# Altium PCB ffultra_pcb_attempt2.PcbDoc (part 1 of 3)
Units mil, origin at the board's own origin, x right, y up, seen from the top; angles counter-clockwise.
Board outline 1102.36 x 2165.35 mil, 6 copper layers (Top, GND-T, Inner, Power, GND-B, Bottom), stack 60.567 mil thick; 114 components, 86 nets, 459 pads, 324 vias.
Unrouted connection lines stored in the file: 9.
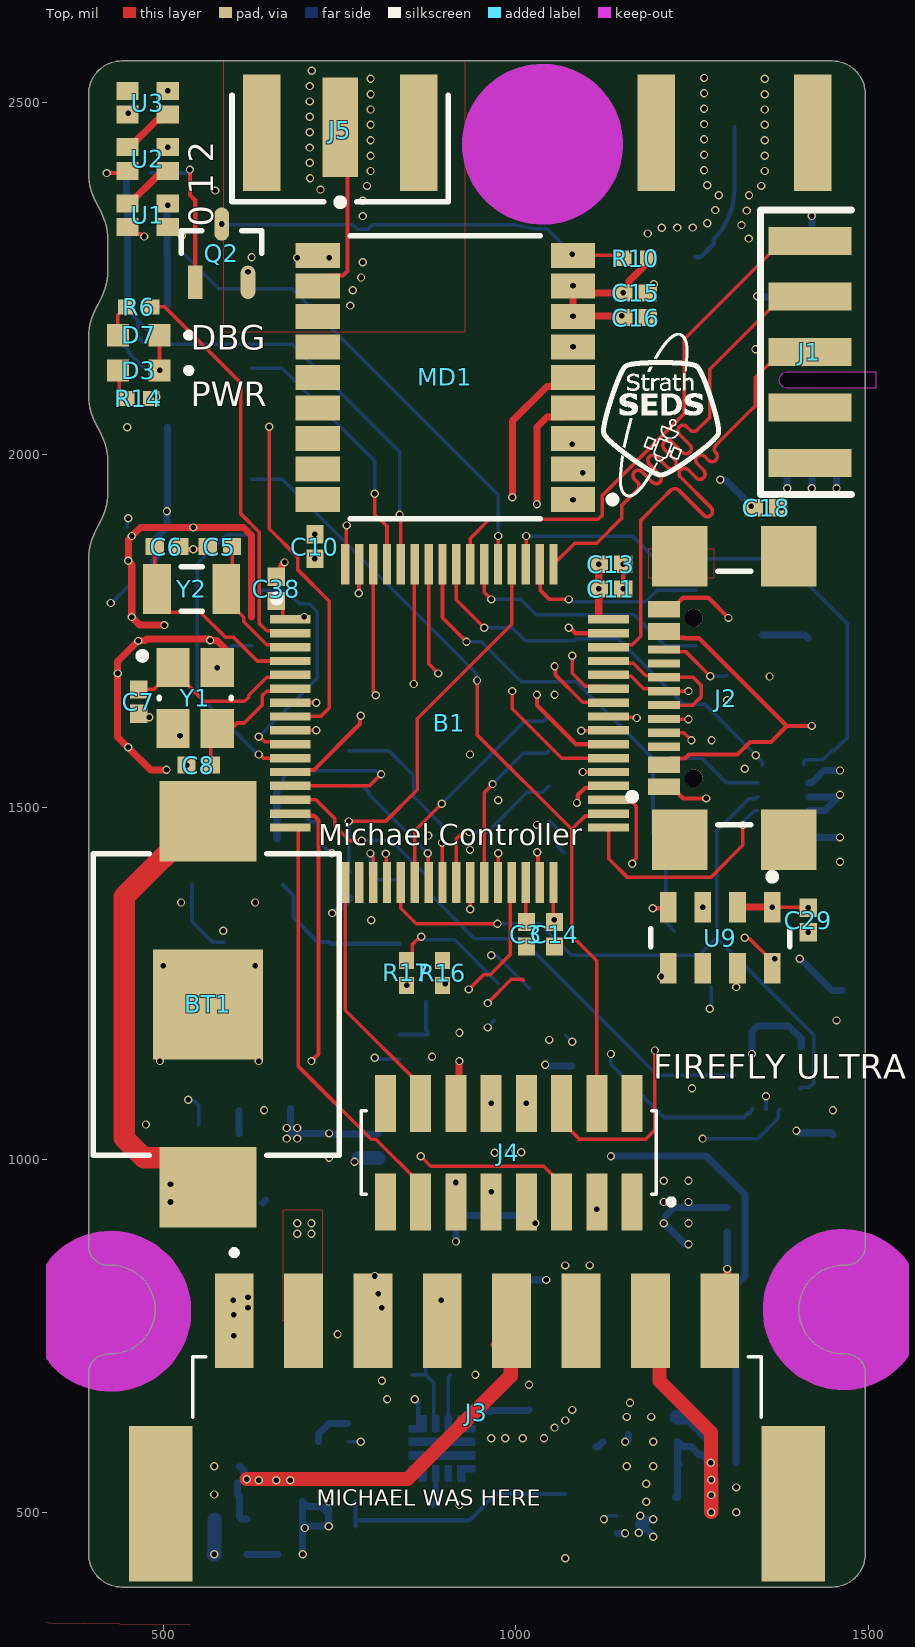
[diagram p0: Top view]
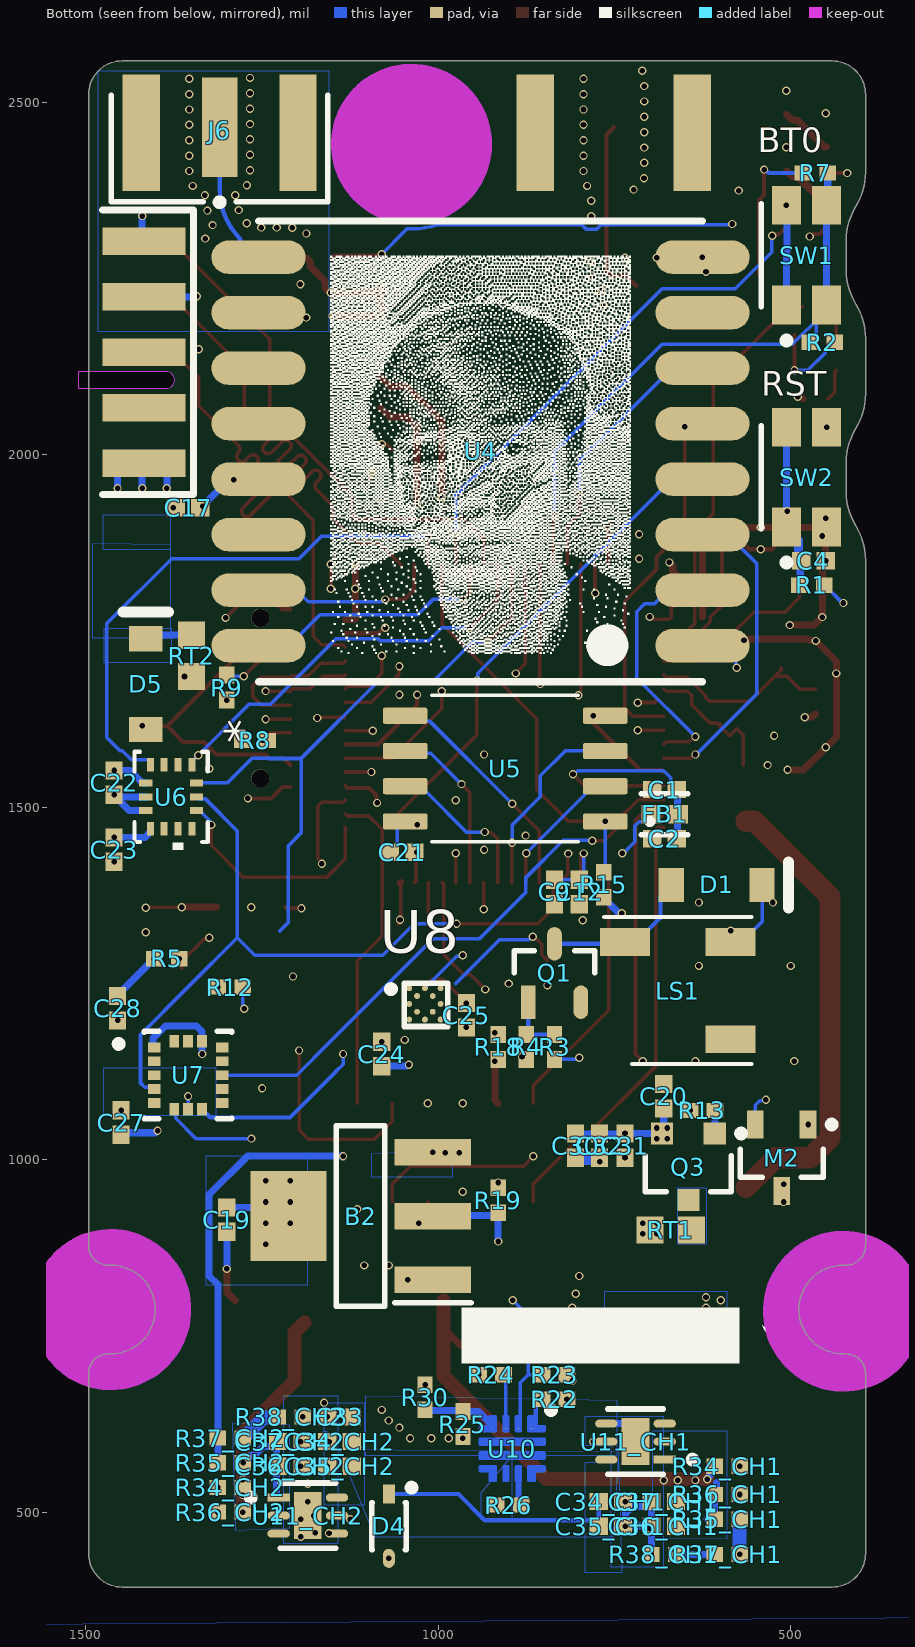
[diagram p1: Bottom view, seen from below]
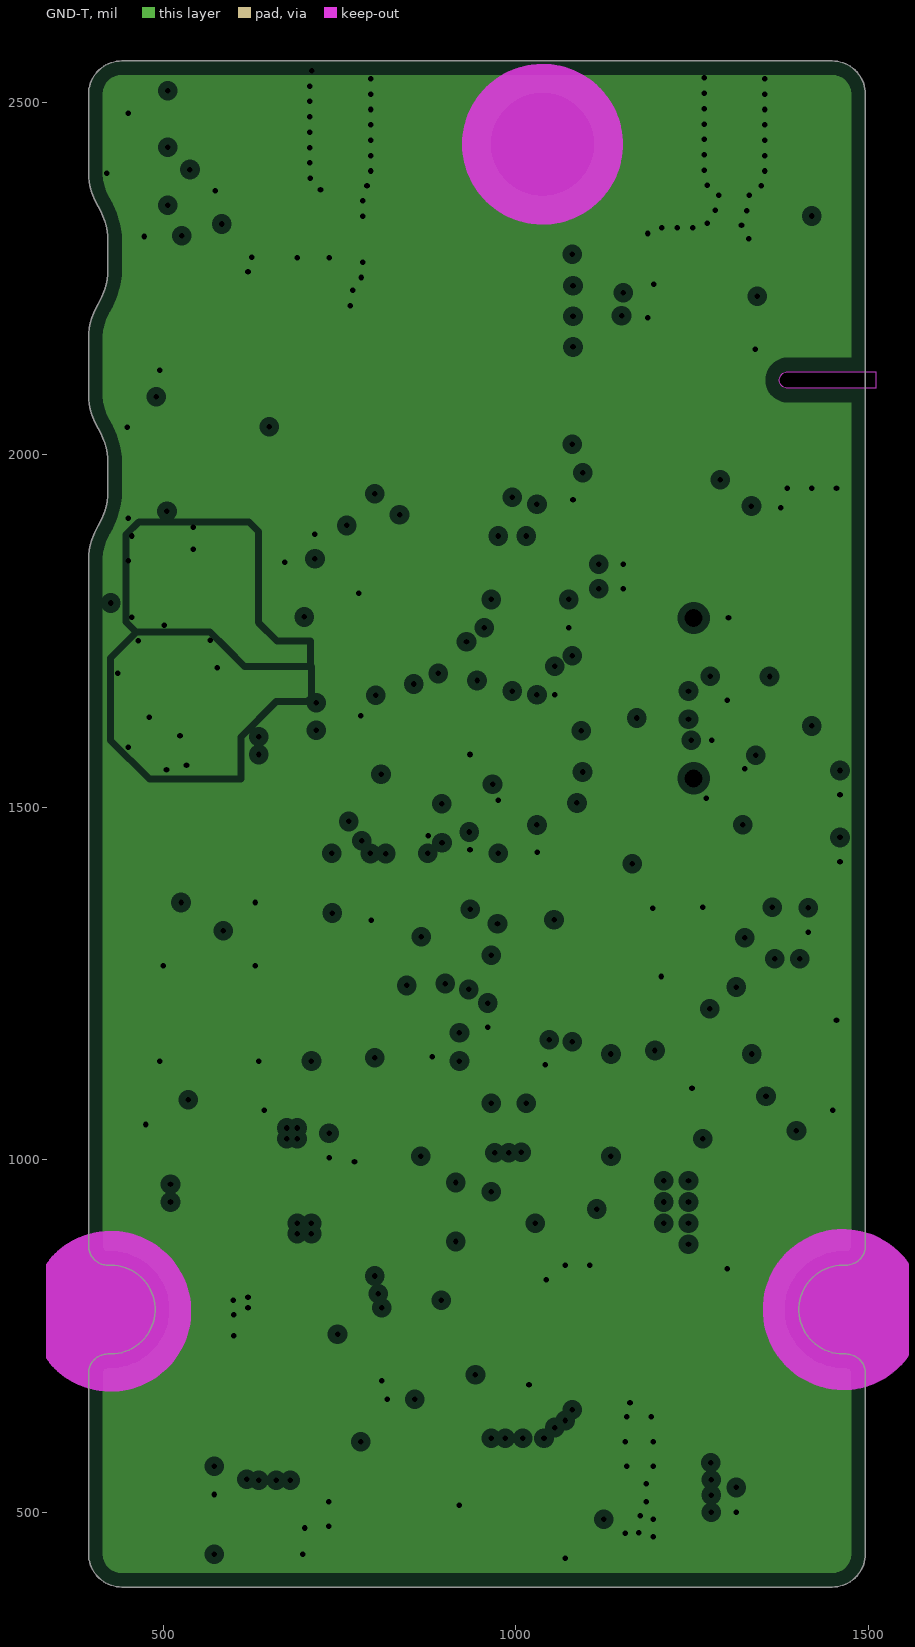
[diagram p2: GND-T, clearances drawn from the general rule]
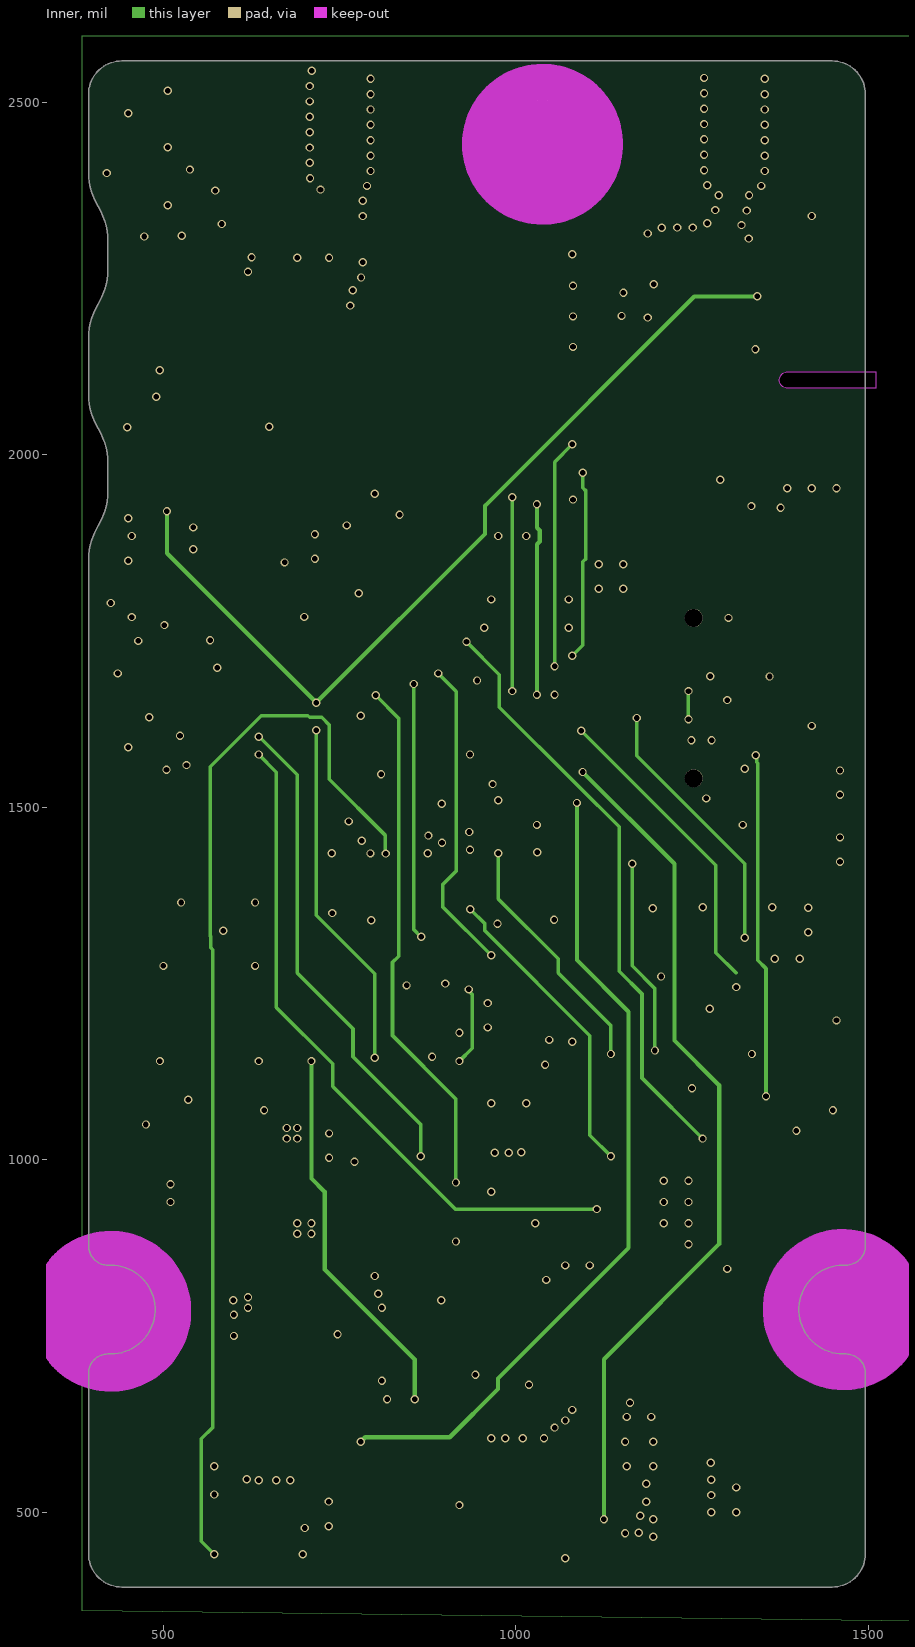
[diagram p3: Inner]
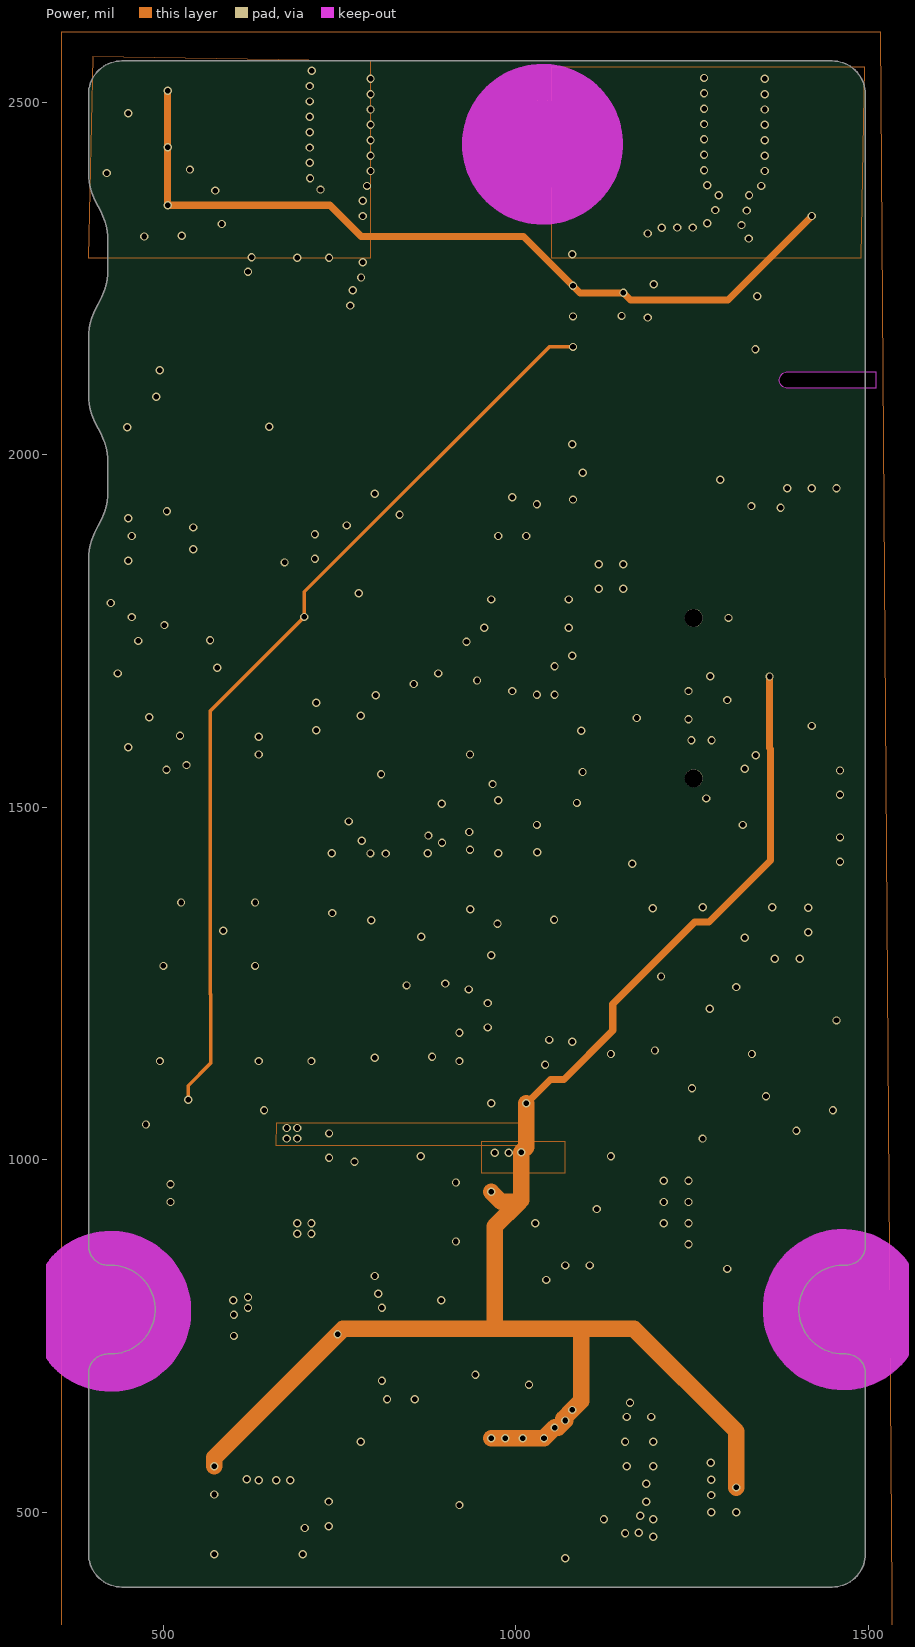
[diagram p4: Power]
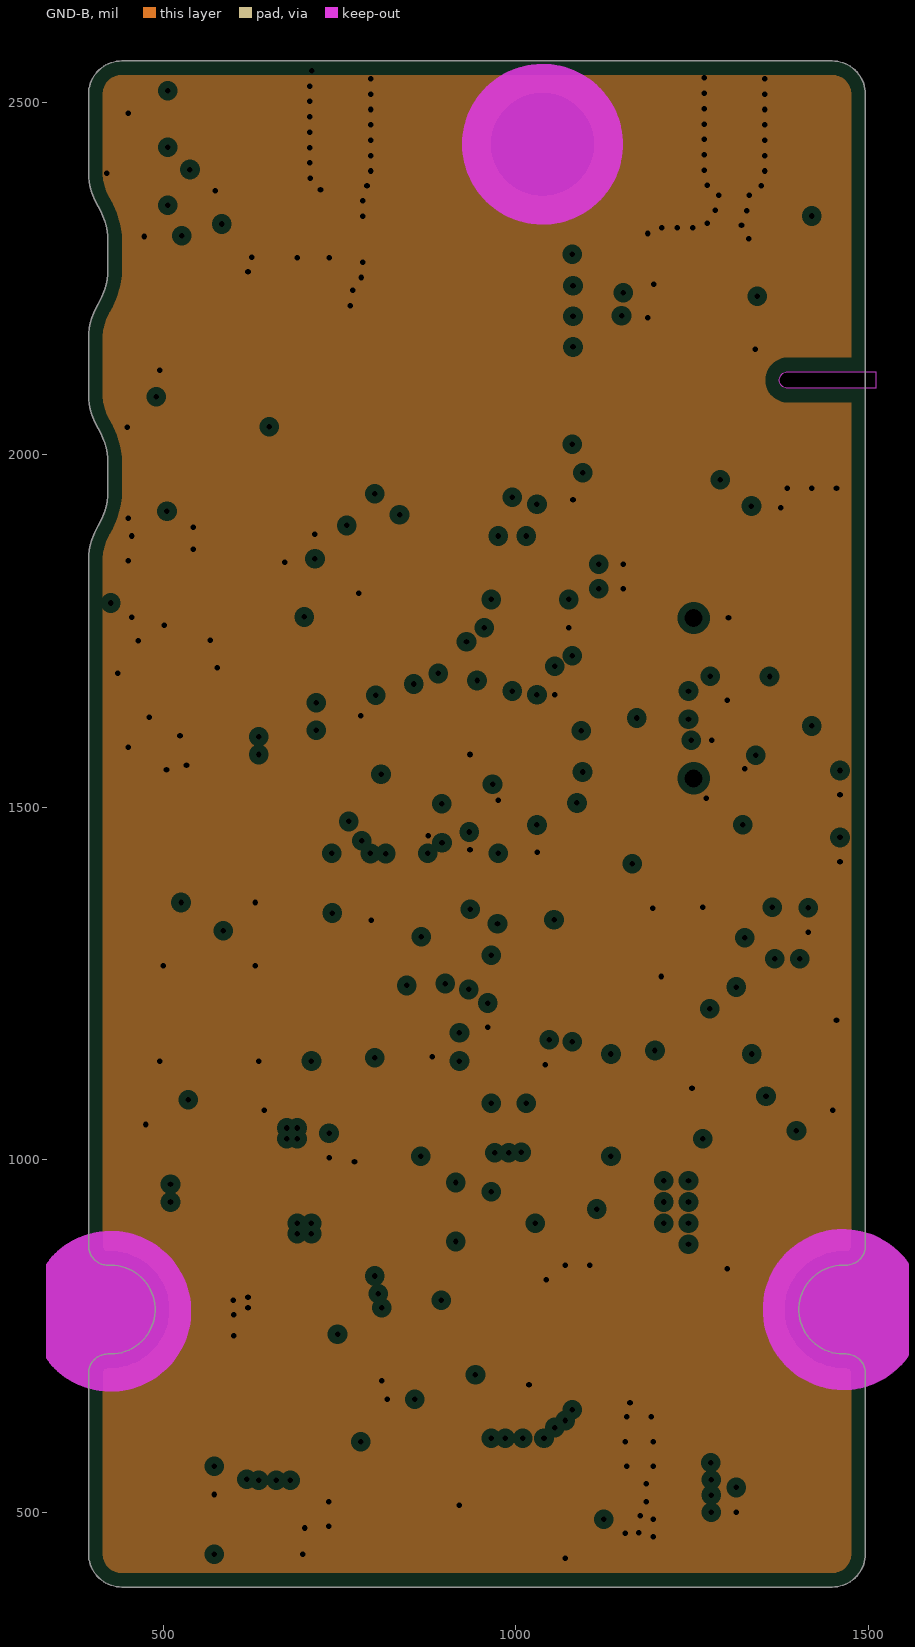
[diagram p5: GND-B, clearances drawn from the general rule]

## Layer stack, top to bottom
Top Solder: solder mask 1.2, SM-001, Dk 3.8
Top: signal copper 1.378
Dielectric 4: prepreg 3.9134, 3313, Dk 4.05
GND-T: plane copper 0.5984, net GND
Dielectric 2: core 21.6535, Core-009, Dk 4.6
Inner: signal copper 0.5984
Dielectric 1: prepreg 4.2835, 2116, Dk 4.25
Power: signal copper 0.5984
Dielectric 3: core 21.6535, Core-009, Dk 4.6
GND-B: plane copper 0.5984, net GND
Dielectric 5: prepreg 3.9134, 3313, Dk 4.05
Bottom: signal copper 1.378
Bottom Solder: solder mask 1.2, SM-001, Dk 3.8

## Board outline
393.7,696.85 cw(c421.26,696.85) 421.26,724.41 425.2,724.41 ccw(c425.2,787.4) 425.2,850.39 421.26,850.39 cw(c421.26,877.95) 393.7,877.95 393.7,1850.39 cw(c488.47,1850.39) 407.48,1899.61 ccw(c326.49,1948.82) 421.26,1948.82 421.26,1988.19 ccw(c326.49,1988.19) 407.48,2037.4 cw(c488.47,2086.61) 393.7,2086.61 393.7,2165.35 cw(c488.47,2165.35) 407.48,2214.57 ccw(c326.49,2263.78) 421.26,2263.78 421.26,2303.15 ccw(c326.49,2303.15) 407.48,2352.36 cw(c488.47,2401.57) 393.7,2401.57 393.7,2511.81 cw(c440.94,2511.81) 440.94,2559.06 1448.82,2559.06 cw(c1448.82,2511.81) 1496.06,2511.81 1496.06,877.95 cw(c1468.5,877.95) 1468.5,850.39 1464.57,850.39 ccw(c1464.57,787.4) 1464.57,724.41 1468.5,724.41 cw(c1468.5,696.85) 1496.06,696.85 1496.06,440.94 cw(c1448.82,440.94) 1448.82,393.7 440.94,393.7 cw(c440.94,440.94) 393.7,440.94

## Design rules (kind name [scope] priority, off if disabled: settings)
BoardOutlineClearance [All] p1: gap=7.87 ignorepadtopadclearanceinfootprint=FALSE except(0: Text-OutlineEdge Text-CavityEdge Text-CutoutEdge Text-SplitBarrior Text-SplitContinuation)
Clearance [All] p1: gap=10 ignorepadtopadclearanceinfootprint=TRUE except(0: Arc-Hole Track-Hole SMDPad-Hole THPad-Hole Via-Hole Fill-Hole Poly-Hole Region-Hole Text-Hole; 3.54: Arc-Arc Arc-Track Track-Track; 5: SMDPad-SMDPad; 7.87: Arc-SMDPad Track-SMDPad SMDPad-Fill SMDPad-Poly SMDPad-Region Fill-Fill Fill-Poly Fill-Region Poly-Poly Poly-Region Region-Region; 12.99: Arc-THPad Track-THPad; 19.68: THPad-THPad)
DiffPairsRouting [All] p1: maxlimit=10 minlimit=3.54 mostfreqgap=10 toplayer_minwidth=3.54 toplayer_maxwidth=15 toplayer_prefwidth=10 midlayer2_minwidth=3.54 midlayer2_maxwidth=15 midlayer2_prefwidth=10 midlayer3_minwidth=3.54 midlayer3_maxwidth=15 midlayer3_prefwidth=10 bottomlayer_minwidth=3.54 bottomlayer_maxwidth=15 bottomlayer_prefwidth=10 maxuncoupledlength=500
HoleSize [All] p1: absolutevalues=TRUE maxlimit=248.03 minlimit=7.87 maxpercent=80.000 minpercent=20.000
MatchedLengths [(InNet('SWO') OR InNet('SWCLK') OR InNet('SWDIO') OR InNet('SWDIO'))] p1: tolerance=1 checknetsindiffpair=FALSE checkdiffpairvsdiffpair=TRUE checkxsignals=TRUE checkothers=TRUE
MatchedLengths "Schematic Matched Net Lengths" [InNetClass('STLINK')] p2: tolerance=3.94 checknetsindiffpair=FALSE checkdiffpairvsdiffpair=TRUE checkxsignals=TRUE checkothers=TRUE
MinimumSolderMaskSliver [All] p1: minsoldermaskwidth=3.54
PlaneClearance [All] p1: clearance=10
PlaneConnect [All] p1: pad.planeconnectstyle=Relief pad.reliefexpansion=10 pad.reliefentries=4 pad.reliefconductorwidth=10 pad.reliefairgap=10 via.planeconnectstyle=Direct via.reliefexpansion=20 via.reliefentries=4 via.reliefconductorwidth=10 via.reliefairgap=10
PolygonConnect PolygonConnect_gnd_ant [IsNamedPolygon('GND_ANT')] p1: thpad.connectstyle=Relief thpad.reliefconductorwidth=10 thpad.reliefentries=4 thpad.polygonreliefangle="90 Angle" thpad.airgapwidth=10 smdpad.connectstyle=Relief smdpad.reliefconductorwidth=19.68 smdpad.reliefentries=4 smdpad.polygonreliefangle="90 Angle" smdpad.airgapwidth=5 via.connectstyle=Direct via.reliefconductorwidth=10 via.reliefentries=4 via.polygonreliefangle="90 Angle" via.airgapwidth=10
PolygonConnect [All] p2: thpad.connectstyle=Relief thpad.reliefconductorwidth=10 thpad.reliefentries=4 thpad.polygonreliefangle="90 Angle" thpad.airgapwidth=10 smdpad.connectstyle=Direct smdpad.reliefconductorwidth=10 smdpad.reliefentries=4 smdpad.polygonreliefangle="90 Angle" smdpad.airgapwidth=10 via.connectstyle=Direct via.reliefconductorwidth=10 via.reliefentries=4 via.polygonreliefangle="90 Angle" via.airgapwidth=10
RoutingVias [All] p1: holewidth=7.87 width=13.78 viastyle="Through Hole" minholewidth=5.91 minwidth=9.84 maxholewidth=28 maxwidth=50 useviatemplates=TRUE viatemplateguid#1={D842139F-6F32-4212-9B27-BAE97ACFDABE} viatemplateguid#2={DD1D606A-29FF-4885-8C69-D1AE082B58F4} viatemplatename#1=v30h20 viatemplatename#2=v35h20
SolderMaskExpansion SolderMaskExpansion_via [IsVia] p1: expansion=4 istentingtop=TRUE
SolderMaskExpansion [All] p2: expansion=1.97 istentingtop=FALSE
SupplyNets "Schematic Supply Nets_4" [InNet('VBACKUP')] p1: voltage=0.000
SupplyNets "Schematic Supply Nets_2" [InNet('3V3')] p2: voltage=0.000
SupplyNets "Schematic Supply Nets_5" [InNet('VBAT')] p3: voltage=0.000
SupplyNets "Schematic Supply Nets_1" [InNet('GND')] p4: voltage=0.000
SupplyNets "Schematic Supply Nets" [InNet('VDDA')] p5: voltage=0.000
Width Width_ANT [InNet('GPS_ANT','RD_ANT')] p1: maxlimit=6.08 minlimit=5.18 preferedwidth=6.08 toplayer_minwidth=6.08 bottomlayer_minwidth=6.08 impedanceprofiledriven=TRUE impedanceprofileid={4A9DADD4-1E54-47D4-9708-552C67BF1AE2} impedanceprofilevalue=50.000000 minimp=50.000000 maximp=50.000000 favimp=50.000000
Width [All] p2: maxlimit=29.92 minlimit=3.94 preferedwidth=10 minimp=50.000000 maximp=50.000000 favimp=50.000000
25 further rules are at their usual default settings.

## Classes and differential pairs
component class "Human Interfaces": D1 D7 LS1 Q1 R3 R4 R6 U1 U2 U3
channel class ffultra_p2_channel: CH1 CH2
component class Pyro: R22 R23
component class Pressure: C29 U9
component class P1: C30 C31 C32 C33 D4 R24 R25 R26 R30 U10
component class IMU: C22 C23 C24 C25 C27 C28 U6 U7 U8
component class CH2: C34_CH2 C35_CH2 C36_CH2 C37_CH2 R34_CH2 R35_CH2 R36_CH2 R37_CH2 R38_CH2 U11_CH2
component class CH1: C34_CH1 C35_CH1 C36_CH1 C37_CH1 R34_CH1 R35_CH1 R36_CH1 R37_CH1 R38_CH1 U11_CH1
net class STLINK: SWCLK SWDIO SWO
net class QSPI: "Flash CLK" "Flash IO 0" "Flash IO 1" "Flash IO 2" "Flash IO 3" "Flash NCS"
component class Storage: C21 R15 U5
component class Power: B2 C19 C20 D3 D5 Q3 R13 R14 RT1 RT2
component class Wireless: BT1 C15 C16 C17 C18 C38 J5 J6 M2 MD1 Q2 R7 R10 U4
component class Connectors: 32 J2 J3 J4 R8 R9
component class MCU: B1 C1 C2 C3 C4 C5 C6 C7 C8 C9 C10 C11 C12 C13 C14 FB1 J1 R1 R2 R5 R12 R16 R17 R18 R19 SW1 SW2 Y1 Y2
differential pair USB_Data: +USB_Data_P -USB_Data_N

## Components (designator, comment, footprint, x,y, rotation, side; value= is the part's Value field where it differs from the comment)
B1 "STM32F412RGT6" QFP50P1200X1200X160-64N 905.79,1619.09 r0 top
B2 "LDL1117S33R" SOT230P700X180-4N 1110,920 r0 bottom
BT1 "3030" FP-3030-MFG 574.8,1220.47 r90 top
C1 "CL05B104KO5NNNC" CAP-0402 678.82,1525.31 r180 bottom value=100nF
C2 "CL05A105KA5NQNC" CAP-0402 678.82,1455.31 r180 bottom value=1µF
C3 "CL05A475MP5NRNC" CAP-0402 1015,1320 r90 top value=4.7µF
C4 "CL05B104KO5NNNC" CAP-0402 467.6,1850 r0 bottom value=100nF
C5 "C1005NP0439CGTS" CAP-0402 580,1870 r0 top value=4.3pF
C6 "C1005NP0439CGTS" CAP-0402 505,1870 r180 top value=4.3pF
C7 "0402CG6R0C500NT" CAP-0402 465,1650 r90 top value=6pF
C8 "0402CG6R0C500NT" CAP-0402 550,1560 r0 top value=6pF
C9 "CL05A475MP5NRNC" CAP-0402 835,1380 r90 bottom value=4.7µF
C10 "CL05B104KO5NNNC" CAP-0402 715,1870 r270 top value=100nF
C11 "CL05B104KO5NNNC" CAP-0402 1135,1810 r180 top value=100nF
C12 "CL05B104KO5NNNC" CAP-0402 800,1380 r90 bottom value=100nF
C13 "CL05B104KO5NNNC" CAP-0402 1135,1845 r180 top value=100nF
C14 "CL05B104KO5NNNC" CAP-0402 1055,1320 r90 top value=100nF
C15 "0402CG101J500NT" CAP-0402 1170,2230 r180 top value=100pF
C16 "CL05B104KO5NNNC" CAP-0402 1170,2195 r180 top value=100nF
C17 "GRM155R61A106ME44D" CAP-0402 1355,1925 r180 bottom value=10µF
C18 "CL05B104KO5NNNC" CAP-0402 1355,1925 r180 top value=100nF
C19 "CL05A475MP5NRNC" CAP-0402 1300,915 r90 bottom value=4.7µF
C20 "CL05A105KA5NQNC" CAP-0402 680,1090 r270 bottom value=1µF
C21 "CL05B104KO5NNNC" CAP-0402 1051.1,1436.22 r0 bottom value=100nF
C22 "CL05B104KO5NNNC" CAP-0402 1460,1535 r90 bottom value=100nF
C23 "CL05B104KO5NNNC" CAP-0402 1460,1440 r90 bottom value=100nF
C24 "CL05B104KO5NNNC" CAP-0402 1080,1150 r90 bottom value=100nF
C25 "CL05B104KO5NNNC" CAP-0402 960,1205 r270 bottom value=100nF
C27 "CL05A105KA5NQNC" CAP-0402 1450,1052.68 r270 bottom value=1µF
C28 "CL05B104KO5NNNC" CAP-0402 1455,1215 r90 bottom value=100nF
C29 "CL05B104KO5NNNC" CAP-0402 1415,1340 r270 top value=100nF
C30 "GRM155R61A106ME44D" CAP-0402 805,1020 r270 bottom value=10µF
C31 "GRM155R61A106ME44D" CAP-0402 735,1020 r270 bottom value=10µF
C32 "CL05A105KA5NQNC" CAP-0402 771.1,1020 r90 bottom value=1µF
C33 "CL05A225MQ5NSNC" CAP-0402 1140,635 r180 bottom value=2.2µF
C34_CH1 "CL05A225MQ5NSNC" CAP-0402 755,515 r0 bottom value=2.2µF (schematic designator C34)
C34_CH2 "CL05A225MQ5NSNC" CAP-0402 1140,600 r180 bottom value=2.2µF (schematic designator C34)
C35_CH1 "CL05A225MQ5NSNC" CAP-0402 755,480 r0 bottom value=2.2µF (schematic designator C35)
C35_CH2 "CL05A225MQ5NSNC" CAP-0402 1140,565 r180 bottom value=2.2µF (schematic designator C35)
C36_CH1 "CL05A105KA5NQNC" CAP-0402 680,480 r180 bottom value=2.2µF (schematic designator C36)
C36_CH2 "CL05A105KA5NQNC" CAP-0402 1210,565 r0 bottom value=2.2µF (schematic designator C36)
C37_CH1 "CL05A105KA5NQNC" CAP-0402 680,515 r180 bottom value=2.2µF (schematic designator C37)
C37_CH2 "CL05A105KA5NQNC" CAP-0402 1210,600 r0 bottom value=2.2µF (schematic designator C37)
C38 "CL05A105KA5NQNC" CAP-0402 660,1810 r90 top value=1µF
D1 "SM4007PL-TP" MCC-SOD-123FL_V 605,1390 r180 bottom
D3 "KT-0603R" LED_KT-0603R 465,2120 r180 top
D4 "1N5819WS" FP-477-02-IPC_C 1070,480 r270 bottom
D5 "SM4007PL" MCC-SOD-123FL_V 1415,1675 r90 bottom
D7 "KT-0603R" LED_KT-0603R 465,2170 r180 top
FB1 "BLM15AG601SN1D" FP-BLM15-0_05-IPC_A 678.82,1490.31 r0 bottom
J1 "009159010061911" 009159010061911-Footprint-1 1496.06,2145.67 r270 top
J2 "TYPE-C16PQTWT" FP-USB4110-GF-A-MFG 1355,1655 r90 top
J3 "1771088" PHOENIX_1771088 944.88,366.14 r0 top
J4 "20021321-00016C4LF" AMPHENOL_20021321-00016C4LF 990,1010.12 r0 top
J5 "SMA-J-P-H-ST-EM1" "Copy of FP-SMA-J-P-H-ST-EM1-MFG" 750.79,2727.2 r180 top locked
J6 "SMA-J-P-H-ST-EM1" SMA-J-P-H-ST-EM1-With-868-ant 1325.16,2685.81 r0 bottom locked
LS1 "MLT-5020" MLT-5020 660,1240 r0 bottom
M2 "XC6206P332MR-G" SOT95P245X110-3N 512.6,1002.76 r270 bottom
MD1 "TESEO-LIV4F" FP-LCC-18-MFG 900,2110 r180 top
Q1 "AO3400A" FP-SOT23-IPC_C 835,1265 r90 bottom
Q2 "AO3400A" FP-SOT23-IPC_C 582.6,2286.36 r90 top
Q3 "AO3401A" AO-SOT-23-3L_V 645,990 r270 bottom
R1 "0402WGF1002TCE" RES-0402 470,1815 r180 bottom value=10k
R2 "0402WGF1002TCE" RES-0402 455,2160 r0 bottom value=10k
R3 "0402WGF3300TCE" RES-0402 835,1160 r90 bottom value=330
R4 "0402WGF1002TCE" RES-0402 875,1160 r90 bottom value=10k
R5 "0402WGF2201TCE" RES-0402 1385,1285 r0 bottom value=2.2k
R6 "0402WGF3300TCE" RES-0402 465,2210 r0 top value=330
R7 "0402WGF1002TCE" RES-0402 465,2400 r180 bottom value=10k
R8 "0402WGF5101TCE" RES-0402 1260,1595 r180 bottom value=5.1k
R9 "0402WGF5101TCE" RES-0402 1300,1670 r90 bottom value=5.1k
R10 "0402WGF1001TCE" RES-0402 1170,2279.17 r180 top value=1k
R12 "0402WGF2201TCE" RES-0402 1295,1245 r180 bottom value=2.2k
R13 "0402WGF1002TCE" RES-0402 625,1070 r180 bottom value=10k
R14 "0402WGF2200TCE" RES-0402 465,2080 r0 top value=220
R15 "0402WGF1002TCE" RES-0402 765,1390 r270 bottom value=10k
R16 "0402WGF2201TCE" RES-0402 896.02,1265 r270 top value=2.2k
R17 "0402WGF2201TCE" RES-0402 845,1265 r270 top value=2.2k
R18 "0402WGF2201TCE" RES-0402 915,1160 r90 bottom value=2.2k
R19 "0402WGF2201TCE" RES-0402 915,942.72 r270 bottom value=2.2k
R22 "0402WGF1002TCE" RES-0402 835,660 r0 bottom value=10k
R23 "0402WGF1002TCE" RES-0402 835,695 r0 bottom value=10k
R24 "0402WGF1002TCE" RES-0402 925,695 r0 bottom value=10k
R25 "0402WGF4702TCE" RES-0402 965,625 r270 bottom value=47k
R26 "0402WGF6800TCE" RES-0402 900,510 r180 bottom value=680
R30 "0402WGF1002TCE" RES-0402 1018.7,663.02 r270 bottom value=10k
R34_CH1 "0402WGF4702TCE" RES-0402 590,565 r180 bottom value=47k (schematic designator R34)
R34_CH2 "0402WGF4702TCE" RES-0402 1295,535 r0 bottom value=47k (schematic designator R34)
R35_CH1 "0402WGF4702TCE" RES-0402 590,490 r0 bottom value=47k (schematic designator R35)
R35_CH2 "0402WGF4702TCE" RES-0402 1295,570 r180 bottom value=47k (schematic designator R35)
R36_CH1 "0402WGF4702TCE" RES-0402 590,525 r0 bottom value=47k (schematic designator R36)
R36_CH2 "0402WGF4702TCE" RES-0402 1295,500 r180 bottom value=47k (schematic designator R36)
R37_CH1 "0402WGF2202TCE" RES-0402 590,440 r180 bottom value=22k (schematic designator R37)
R37_CH2 "0402WGF2202TCE" RES-0402 1295,605 r0 bottom value=22k (schematic designator R37)
R38_CH1 "0402WGF1002TCE" RES-0402 680,440 r180 bottom value=10k (schematic designator R38)
R38_CH2 "0402WGF1002TCE" RES-0402 1210,635 r0 bottom value=10k (schematic designator R38)
RT1 "2A Fuse" THRMC1608X95N 670,900 r180 bottom
RT2 "2A Fuse" THRMC1608X95N 1350,1715 r270 bottom
SW1 "EVQ-P7A01P" FP-EVQ-P7A01P-MFG 464.57,2283.46 r90 bottom locked
SW2 "EVQ-P7A01P" FP-EVQ-P7A01P-MFG 464.57,1968.5 r90 bottom locked
U1 "XL-1615RGBC-WS2812B" XL-1615RGBC-WS2812B-Footprint-1 477.44,2340 r0 top
U2 "XL-1615RGBC-WS2812B" XL-1615RGBC-WS2812B-Footprint-1 477.44,2420 r0 top
U3 "XL-1615RGBC-WS2812B" XL-1615RGBC-WS2812B-Footprint-1 477.44,2500 r0 top
U4 "LoRa-CC68-868-TCXO" LoRa-CC68-868-TCXO-Footprint-1 940,2005 r0 bottom
U5 "W25Q128JVSIQ" SOIC127P790X216-8N 905,1555 r0 bottom
U6 "BMI323" BMI323_BOS 1379,1515 r270 bottom
U7 "H3LIS331DLTR" FP-TFLGA16-7983231-MFG 1355,1120 r180 bottom
U8 "BMM150" FP-BMM150-IPC_B 1017.48,1219.76 r180 bottom
U9 "MS560702BA03-50" TECO-MS560702BA03-50_V 1290,1315 r270 top
U10 "TPS22811LRPWR" TPS22811LRPWR-Footprint-1 895,590 r270 bottom
U11_CH1 "TPS22810DRVR" FP-DRV0006A-IPC_A 720,600 r0 bottom (schematic designator U11)
U11_CH2 "TPS22810DRVR" FP-DRV0006A-IPC_A 1185,495 r180 bottom (schematic designator U11)
Y1 "NX3225GA-16.000M-STD-CRG-2" FP-NX3225GA-MFG 545,1655 r270 top value=8pF
Y2 "NX3215SA-32.768KHZ-EXS00A-MU00746" FP-NX3215SA-MFG 540,1810 r180 top value=7pF

## Footprints (in the part's own frame and the unit in brackets; to place one, negate y for a bottom-side part, rotate by r counter-clockwise, add the part's x,y. Pads: shape width x height; smd on the part's side, far side on the other; paste and mask are expansions set on the pad)
009159010061911-Footprint-1 [mm]
  rect 1x3 smd: 1(3.991,-2) 2(1.991,-2) 3(-0.009,-2) 4(-2.009,-2) 5(-4.009,-2)
  rect 1x3 smd far side: 6(4,-2) 7(2,-2) 8(0,-2) 9(-2,-2) 10(-4,-2)
  Keep-Out Layer board cut-out: 0.7,0.381 1.3,0.381 1.3,-2.8 1.27,-2.93 1.187,-3.035 1.067,-3.092 0.933,-3.092 0.813,-3.035 0.73,-2.93 0.7,-2.8 0.7,-2.8
  silkscreen extent -5.13,-3.78 5.13,-0.5, body extent -5,-3.5 5,6.5, height 1.7
AMPHENOL_20021321-00016C4LF [mm]
  rect 0.76x2.05 smd: 1(4.445,-1.775) 2(4.445,1.775) 3(3.175,-1.775) 4(3.175,1.775) 5(1.905,-1.775) 6(1.905,1.775) 7(0.635,-1.775) 8(0.635,1.775) 9(-0.635,-1.775) 10(-0.635,1.775) 11(-1.905,-1.775) 12(-1.905,1.775) 13(-3.175,-1.775) 14(-3.175,1.775) 15(-4.445,-1.775) 16(-4.445,1.775)
  silkscreen extent -5.31,-1.87 5.95,1.5, body extent -5.31,-2.25 5.31,2.25, height 4.65
AO-SOT-23-3L_V [mm] "SOT23, 3-Leads, Body 3.1x1.8mm, Pitch 0.95mm"
  rect 0.8x0.8 smd: 1(-1.2,0.95) 2(-1.2,-0.95) 3(1.2,0)
  silkscreen extent -1.32,-1.55 0.9,2.02, body extent -1.5,-1.55 1.5,1.55, height 1.25
BMI323_BOS [mil]
  rect 19x10 smd paste+0 mask+0: 1(-45.5,29.53) 2(-45.5,9.84) 3(-45.5,-9.84) 4(-45.5,-29.53) 8(45.5,-29.53) 9(45.5,-9.84) 10(45.5,9.84) 11(45.5,29.53)
  rect 10x19 smd paste+0 mask+0: 5(-19.68,-36) 6(0,-36) 7(19.68,-36) 12(19.68,36) 13(0,36) 14(-19.68,36)
  silkscreen extent -64,-52 75,52, body extent -59,-47 59,47, height 34
CAP-0402 [mm] "Chip Capacitor, 2-Leads, Body 1.00x0.50mm, IPC Medium Density"
  rect 0.66x0.62 smd: 1(-0.44,0) 2(0.44,0)
  body extent -0.53,-0.28 0.53,0.28, height 0.55
"Copy of FP-SMA-J-P-H-ST-EM1-MFG" [mm]
  rect 1.27x3.6 smd paste+0 mask+0: 1(0,6.66)
  rect 1.35x4.2 smd paste+0 mask+0: 2(-2.825,6.86) 3(2.825,6.86)
  rect 1.35x4.2 smd far side paste+0 mask+0: 4(-2.825,6.86) 5(2.825,6.86)
  silkscreen extent -3.9,5.5 3.9,9.48, body extent -9.25,-50 9.25,8.56, height 9.85
FP-477-02-IPC_C [mm]
  rect 0.686x0.436 smd paste+0 mask+0: 1(-1.16,0)
  rrect100% 0.686x0.436 smd paste+0 mask+0: 2(1.16,0)
  silkscreen extent -1.51,-0.63 0.85,0.94, body extent -1.25,-0.63 1.25,0.63, height 1.1
FP-3030-MFG [mm]
  rect 3.96x3.96 smd paste-1000 mask+0: 1(0,0.292)
  rect 2.9x3.5 smd paste+0 mask+0: 2(-6.6,0.292) 2(6.6,0.292)
  silkscreen extent -5.44,-4.43 5.44,4.43, body extent -8.15,-5.21 8.15,4.79, height 2.5
FP-BLM15-0_05-IPC_A [mil]
  rect 28.16x26.48 smd paste+0 mask+0: 1(-18.84,0) 2(18.84,0)
  silkscreen extent -33,-29 33,29, body extent -20,-10 20,10, height 22
FP-BMM150-IPC_B [mm]
  round 0.212 smd paste+0 mask+0: A1(-0.601,0.601) A3(-0.035,0.601) A5(0.531,0.601) B2(-0.318,0.318) B4(0.248,0.318) C1(-0.601,0.035) C5(0.531,0.035) D2(-0.318,-0.248) D4(0.248,-0.248) E1(-0.601,-0.531) E3(-0.035,-0.531) E5(0.531,-0.531)
  silkscreen extent -1.39,-0.78 0.78,0.78, body extent -0.78,-0.78 0.78,0.78, height 0.6
FP-DRV0006A-IPC_A [mm]
  rect 0.806x0.292 smd paste+0 mask+0: 1(-1.053,0.65)
  rrect100% 0.806x0.292 smd paste+0 mask+0: 2(-1.053,0) 3(-1.053,-0.65) 4(1.053,-0.65) 5(1.053,0) 6(1.053,0.65)
  rect 1x1.7 smd paste-1000 mask+0: 7(0,0)
  silkscreen extent -2.18,-1.17 1,1.17, body extent -1,-1 1,1, height 0.8
FP-EVQ-P7A01P-MFG [mm]
  rect 1.4x1.05 smd paste+0 mask+0: 1(-1.8,1.05) 1'(1.8,1.05) 2(-1.8,-0.4) 2'(1.8,-0.4)
  silkscreen extent -3.2,0.93 1.85,1.95, body extent -2.35,-1.75 2.35,1.8, height 1.36
FP-LCC-18-MFG [mm]
  rect 1.6x0.9 smd paste+0 mask+0: 1(-4.6,4.4) 2(-4.6,3.3) 3(-4.6,2.2) 4(-4.6,1.1) 5(-4.6,0) 6(-4.6,-1.1) 7(-4.6,-2.2) 8(-4.6,-3.3) 9(-4.6,-4.4) 10(4.6,-4.4) 11(4.6,-3.3) 12(4.6,-2.2) 13(4.6,-1.1) 14(4.6,0) 15(4.6,1.1) 16(4.6,2.2) 17(4.6,3.3) 18(4.6,4.4)
  silkscreen extent -6.15,-5.1 3.42,5.1, body extent -4.85,-5.05 4.85,5.05, height 2.33
FP-NX3215SA-MFG [mm]
  rect 1x1.8 smd paste+0 mask+0: 1(-1.25,0) 2(1.25,0)
  silkscreen extent -0.38,-0.8 0.38,0.8, body extent -1.85,-1 1.85,1, height 0.25
FP-NX3225GA-MFG [mm]
  rect 1.4x1.2 smd paste+0 mask+0: 1(-1.1,-0.8) 2(1.1,-0.8) 3(1.1,0.8) 4(-1.1,0.8)
  silkscreen extent -1.65,-2.03 0.03,1.3, body extent -1.9,-1.5 1.9,1.5, height 0.25
FP-SOT23-IPC_C [mm]
  rect 1.205x0.532 smd paste+0 mask+0: 1(-1.05,0.95)
  rrect100% 1.205x0.532 smd paste+0 mask+0: 2(-1.05,-0.95) 3(1.05,0)
  silkscreen extent 0,-1.45 0.8,1.45, body extent -1.41,-1.45 1.41,1.45, height 1.25
FP-TFLGA16-7983231-MFG [mm]
  rect 0.45x0.35 smd paste+0 mask+0: 1(-1.225,1) 2(-1.225,0.5) 3(-1.225,0) 4(-1.225,-0.5) 5(-1.225,-1) 9(1.225,-1) 10(1.225,-0.5) 11(1.225,0) 12(1.225,0.5) 13(1.225,1)
  rect 0.35x0.45 smd paste+0 mask+0: 6(-0.5,-1.225) 7(0,-1.225) 8(0.5,-1.225) 14(0.5,1.225) 15(0,1.225) 16(-0.5,1.225)
  silkscreen extent -2.63,-1.58 1.58,1.58, body extent -1.5,-1.5 1.5,1.5, height 1
FP-USB4110-GF-A-MFG [mm]
  rect 2.18x2 smd paste+0 mask+0: 1(-5.11,3.105) 2(5.11,3.105) 3(-5.11,-0.825) 4(5.11,-0.825)
  rect 0.6x1.15 smd paste+0 mask+0: A1-B12(-3.2,3.68) A4-B9(-2.4,3.68) B1-A12(3.2,3.68) B4-A9(2.4,3.68)
  rect 0.3x1.15 smd paste+0 mask+0: A5(-1.25,3.68) A6(-0.25,3.68) A7(0.25,3.68) A8(1.25,3.68) B5(1.75,3.68) B6(0.75,3.68) B7(-0.75,3.68) B8(-1.75,3.68)
  round 0.65 hole 0.65 unplated paste-2539.97 mask+0: M1(2.89,2.605) M2(-2.89,2.605)
  silkscreen extent -4.57,0.55 4.57,4.95, body extent -5.65,-3.67 5.65,4.03, height 3.26
LED_KT-0603R [mm]
  rect 0.8x0.8 smd: A(0.75,0) C(-0.75,0)
  silkscreen extent -1.9,-0.1 -1.7,0.1, body extent -0.8,-0.4 0.8,0.4, height 0.65
LoRa-CC68-868-TCXO-Footprint-1 [mm]
  oval 3.4x1.2 smd: 1(-8,7) 2(-8,5) 3(-8,3) 4(-8,1) 5(-8,-1) 6(-8,-3) 7(-8,-5) 8(-8,-7) 9(8,-7) 10(8,-5) 11(8,-3) 12(8,-1) 13(8,1) 14(8,3) 15(8,5) 16(8,7)
  silkscreen extent -8,-8.3 8,8.3, body extent -8,-8 8,8, height 2.1
MCC-SOD-123FL_V [mil] "SODFL, 2-Leads, Body 3.1x1.9mm"
  rect 36x48 smd: 1(-64.5,0) 2(64.5,0)
  silkscreen extent 102,-32 102,32, body extent -73,-37 73,37, height 47
MLT-5020 [mm]
  rect 1.8x1 smd: 1(-1.9,-1.75) 2(1.9,-1.75) 3(-1.9,1.75)
  silkscreen extent -2.65,-2.65 2.65,2.65, body extent -2.5,-2.5 2.5,2.5, height 2
PHOENIX_1771088 [mm]
  rect 1.4x3.4 smd: 1(-8.75,10.3) 2(-6.25,10.3) 3(-3.75,10.3) 4(-1.25,10.3) 5(1.25,10.3) 6(3.75,10.3) 7(6.25,10.3) 8(8.75,10.3)
  rect 2.3x5.6 smd: SH1(-11.4,3.7) SH2(11.4,3.7)
  silkscreen extent -10.25,6.82 10.25,12.85, body extent -12.2,0 12.2,11, height 5.11
QFP50P1200X1200X160-64N [mm]
  rect 1.475x0.3 smd: 1(-5.738,3.75) 2(-5.738,3.25) 3(-5.738,2.75) 4(-5.738,2.25) 5(-5.738,1.75) 6(-5.738,1.25) 7(-5.738,0.75) 8(-5.738,0.25) 9(-5.738,-0.25) 10(-5.738,-0.75) 11(-5.738,-1.25) 12(-5.738,-1.75) 13(-5.738,-2.25) 14(-5.738,-2.75) 15(-5.738,-3.25) 16(-5.738,-3.75) 33(5.738,-3.75) 34(5.738,-3.25) 35(5.738,-2.75) 36(5.738,-2.25) 37(5.738,-1.75) 38(5.738,-1.25) 39(5.738,-0.75) 40(5.738,-0.25) 41(5.738,0.25) 42(5.738,0.75) 43(5.738,1.25) 44(5.738,1.75) 45(5.738,2.25) 46(5.738,2.75) 47(5.738,3.25) 48(5.738,3.75)
  rect 0.3x1.475 smd: 17(-3.75,-5.738) 18(-3.25,-5.738) 19(-2.75,-5.738) 20(-2.25,-5.738) 21(-1.75,-5.738) 22(-1.25,-5.738) 23(-0.75,-5.738) 24(-0.25,-5.738) 25(0.25,-5.738) 26(0.75,-5.738) 27(1.25,-5.738) 28(1.75,-5.738) 29(2.25,-5.738) 30(2.75,-5.738) 31(3.25,-5.738) 32(3.75,-5.738) 49(3.75,5.738) 50(3.25,5.738) 51(2.75,5.738) 52(2.25,5.738) 53(1.75,5.738) 54(1.25,5.738) 55(0.75,5.738) 56(0.25,5.738) 57(-0.25,5.738) 58(-0.75,5.738) 59(-1.25,5.738) 60(-1.75,5.738) 61(-2.25,5.738) 62(-2.75,5.738) 63(-3.25,5.738) 64(-3.75,5.738)
  silkscreen extent -6.35,4.38 -6.1,4.62, body extent -6,-6 6,6, height 1.6
RES-0402 [mm] "Chip Resistor, 2-Leads, Body 1.00x0.50mm, IPC Medium Density"
  rect 0.6x0.55 smd: 1(-0.45,0) 2(0.45,0)
  body extent -0.55,-0.28 0.55,0.28, height 0.4
SMA-J-P-H-ST-EM1-With-868-ant [mm]
  rect 1.27x3.6 smd paste+0 mask+0: 1(-0.381,5.609)
  rect 1.35x4.2 smd paste+0 mask+0: 2(-3.206,5.809) 3(2.444,5.809)
  rect 1.35x4.2 smd far side paste+0 mask+0: 4(-3.206,5.809) 5(2.444,5.809)
  silkscreen extent -4.28,4.45 3.52,8.43, body extent -4.38,-47.25 3.62,7.02, height 4.55
SOIC127P790X216-8N [mm]
  rrect25% 1.61x0.58 smd: 1(-3.605,1.905) 2(-3.605,0.635) 3(-3.605,-0.635) 4(-3.605,-1.905) 5(3.605,-1.905) 6(3.605,-0.635) 7(3.605,0.635) 8(3.605,1.905)
  silkscreen extent -5.31,-2.64 2.64,2.64, body extent -3.95,-2.64 3.95,2.64, height 2.16
SOT95P245X110-3N [mm] "SOT23, 3-Leads, Body 2.90x2.45mm, Pitch 0.95mm, IPC Medium Density"
  rect 1x0.6 smd: 1(-1.2,0.95) 2(-1.2,-0.95) 3(1.2,0)
  silkscreen extent -1.32,-1.5 0.7,1.92, body extent -1.4,-1.45 1.4,1.45, height 1.3
SOT230P700X180-4N [mm]
  rect 2.75x0.95 smd: 1(-2.6,2.3) 2(-2.6,0) 3(-2.6,-2.3)
  rect 2.75x3.25 smd: 4(2.6,0)
  silkscreen extent -3.98,-3.25 0.87,3.25, body extent -3.5,-3.25 3.5,3.25, height 1.8
TECO-MS560702BA03-50_V [mm] "SMD, 8-Leads, Body 3x5mm, Pitch 1.25mm"
  rect 1.1x0.6 smd: 1(-1.1,1.875) 2(-1.1,0.625) 3(-1.1,-0.625) 4(-1.1,-1.875) 5(1.1,-1.875) 6(1.1,-0.625) 7(1.1,0.625) 8(1.1,1.875)
  silkscreen extent -2.32,-2.5 0.32,2.5, body extent -1.5,-2.5 1.5,2.5, height 0.96
THRMC1608X95N [mm]
  rect 0.98x0.97 smd: 1(-0.745,0) 2(0.745,0)
  body extent -0.8,-0.4 0.8,0.4, height 0.45
TPS22811LRPWR-Footprint-1 [mil]
  round 1 smd: 1(-28.54,27.56) 2(-28.54,8.86) 3(-28.54,-8.86) 4(-28.54,-27.56) 5(-9.84,0) 6(9.84,0) 7(28.54,-27.56) 8(28.54,-8.86) 9(28.54,8.86) 10(28.54,27.56)
  silkscreen extent -60,50 -50,60, body extent -39,-39 39,39, height 39
XL-1615RGBC-WS2812B-Footprint-1 [mm]
  rect 0.8x0.65 smd: 1(-0.725,0.425) 2(0.725,0.425) 3(-0.725,-0.425) 4(0.725,-0.425)
  body extent -0.8,-0.75 0.8,0.75, height 0.65

## Part data
B1: library part CMP-020-00025-2, "ARM Microcontrollers - MCU 16/32-BITS MICROS", JLCPCB Part Number=C94351, Manufacturer=STMicroelectronics, Mouser Part Number=511-STM32F412RGT6, Arrow Part Number=STM32F412RGT6, Arrow Price/Stock=https://www.arrow.com/en/products/stm32f412rgt6/stmicroelectronics?region=nac, Datasheet Link=http://www.st.com/content/ccc/resource/technical/document/datasheet/15/90/07/b3/8c/10/4e/95/DM00213872.pdf/files/DM00213872.pdf/jcr:content/translations/en.DM00213872.pdf, Design Item ID=STM32F412RGT6, Geometry.Height=1.6mm, Manufacturer_Part_Number=STM32F412RGT6, Mouser Price/Stock=https://www.mouser.co.uk/ProductDetail/STMicroelectronics/STM32F412RGT6?qs=qzCNEk%252BRr%252Bb0WoPVhlRQfQ%3D%3D, Source=STM32F412RGT6.SchLib
B2: library part CMP-172-000000-3, "STMICROELECTRONICS - LDL1117S33R - LDO, FIXED, 3.3V, 1.2A, SOT-223-3", JLCPCB Part Number=C435835, Manufacturer_Name=STMicroelectronics, Mouser Part Number=511-LDL1117S33R, Datasheet Link=https://componentsearchengine.com/Datasheets/2/LDL1117S33R.pdf, Design Item ID=LDL1117S33R, Geometry.Height=1.8mm, Manufacturer_Part_Number=LDL1117S33R, Mouser Price/Stock=https://www.mouser.co.uk/ProductDetail/STMicroelectronics/LDL1117S33R?qs=AQlKX63v8Rt9Bf6AWSrbFg%3D%3D, Source=LDL1117S33R.SchLib
BT1: library part CMP-002-00103-4, "Batteries/Accessories", RoHS Compliant=Yes
C1 C4 C10 C11 C12 C13 C14 C16 C18 C21 C22 C23 C24 C25 C28 C29: library part CMP-001-00142-1, "Capacitor, Ceramic (MLCC), 100nF, ±10%, 16V, X7R, ±10%, SMD 0402", Case/Package=0402, JLCPCB Basic Part=Yes, JLCPCB Part Number=C1525, Manufacturer="Samsung Electro-Mechanics", Temperature Coefficient=X7R, Tolerance=10%, Voltage Rating=16V, Category="Capacitors - MLCC", ComponentLink1Description=Datasheet, ComponentLink1URL=https://datasheet.lcsc.com/lcsc/1810191219_Samsung-Electro-Mechanics-CL05B104KO5NNNC_C1525.pdf, ComponentLink2Description="JLCPCB Part URL", ComponentLink2URL=https://jlcpcb.com/partdetail/C1525, ComponentLink3Description="LCSC Part URL", ComponentLink3URL=https://lcsc.com/product-detail/Multilayer-Ceramic-Capacitors-MLCC---SMD-SMT_Samsung-Electro-Mechanics-Samsung-Electro-Mechanics-CL05B104KO5NNNC_C1525.html, Design Item ID=CL05B104KO5NNNC, Manufacturer Part Number=CL05B104KO5NNNC, RoHS=Yes, Source=jlcpcb_capacitors_basic.schlib
C2 C20 C27 C32 C38: library part CMP-001-00135-1, "Capacitor, Ceramic (MLCC), 1uF, ±10%, 25V, X5R, ±10%, SMD 0402", Case/Package=0402, JLCPCB Basic Part=Yes, JLCPCB Part Number=C52923, Manufacturer="Samsung Electro-Mechanics", Temperature Coefficient=X5R, Tolerance=10%, Voltage Rating=25V, Category="Capacitors - MLCC", ComponentLink1Description=Datasheet, ComponentLink1URL=https://datasheet.lcsc.com/lcsc/1811091611_Samsung-Electro-Mechanics-CL05A105KA5NQNC_C52923.pdf, ComponentLink2Description="JLCPCB Part URL", ComponentLink2URL=https://jlcpcb.com/partdetail/C52923, ComponentLink3Description="LCSC Part URL", ComponentLink3URL=https://lcsc.com/product-detail/Multilayer-Ceramic-Capacitors-MLCC---SMD-SMT_Samsung-Electro-Mechanics-Samsung-Electro-Mechanics-CL05A105KA5NQNC_C52923.html, Design Item ID=CL05A105KA5NQNC, Manufacturer Part Number=CL05A105KA5NQNC, RoHS=Yes, Source=jlcpcb_capacitors_basic.schlib
C3 C9 C19: library part CMP-001-00139-1, "Capacitor, Ceramic (MLCC), 4.7uF, ±20%, 10V, X5R, ±20%, SMD 0402", Case/Package=0402, JLCPCB Basic Part=Yes, JLCPCB Part Number=C23733, Manufacturer="Samsung Electro-Mechanics", Temperature Coefficient=X5R, Tolerance=20%, Voltage Rating=10V, Category="Capacitors - MLCC", ComponentLink1Description=Datasheet, ComponentLink1URL=https://datasheet.lcsc.com/lcsc/1810191211_Samsung-Electro-Mechanics-CL05A475MP5NRNC_C23733.pdf, ComponentLink2Description="JLCPCB Part URL", ComponentLink2URL=https://jlcpcb.com/partdetail/C23733, ComponentLink3Description="LCSC Part URL", ComponentLink3URL=https://lcsc.com/product-detail/Multilayer-Ceramic-Capacitors-MLCC---SMD-SMT_Samsung-Electro-Mechanics-Samsung-Electro-Mechanics-CL05A475MP5NRNC_C23733.html, Design Item ID=CL05A475MP5NRNC, Manufacturer Part Number=CL05A475MP5NRNC, RoHS=Yes, Source=jlcpcb_capacitors_basic.schlib
C5 C6: library part CMP-001-02165-2, "50V 4.3pF NP0 0402  Multilayer Ceramic Capacitors MLCC - SMD/SMT ROHS", JLCPCB Part Number=C147367
C7 C8: library part CMP-001-02164-2, "50V 6pF C0G 0402  Multilayer Ceramic Capacitors MLCC - SMD/SMT ROHS", JLCPCB Part Number=C1575
C15: library part CMP-001-00112-1, "Capacitor, Ceramic (MLCC), 100pF, ±5%, 50V, C0G, ±5%, SMD 0402", Case/Package=0402, JLCPCB Basic Part=Yes, JLCPCB Part Number=C1546, Manufacturer="FH(Guangdong Fenghua Advanced Tech)", Temperature Coefficient=C0G, Tolerance=5%, Voltage Rating=50V, Category="Capacitors - MLCC", ComponentLink1Description=Datasheet, ComponentLink1URL=https://datasheet.lcsc.com/lcsc/1810151218_FH--Guangdong-Fenghua-Advanced-Tech-0402CG101J500NT_C1546.pdf, ComponentLink2Description="JLCPCB Part URL", ComponentLink2URL=https://jlcpcb.com/partdetail/C1546, ComponentLink3Description="LCSC Part URL", ComponentLink3URL=https://lcsc.com/product-detail/Multilayer-Ceramic-Capacitors-MLCC---SMD-SMT_FH-Guangdong-Fenghua-Advanced-Tech-FH-Guangdong-Fenghua-Advanced-Tech-0402CG101J500NT_C1546.html, Design Item ID=0402CG101J500NT, Manufacturer Part Number=0402CG101J500NT, RoHS=Yes, Source=jlcpcb_capacitors_basic.schlib
C17 C30 C31: library part CMP-001-01770-1, "Capacitor, Ceramic (MLCC), 10uF, ±20%, 10V, X5R, ±20%, SMD 0402", Case/Package=0402, JLCPCB Basic Part=No, JLCPCB Part Number=C77000, Manufacturer="Murata Electronics", Temperature Coefficient=X5R, Tolerance=20%, Voltage Rating=10V, Category="Capacitors - MLCC", ComponentLink1Description=Datasheet, ComponentLink1URL=https://datasheet.lcsc.com/lcsc/1811141510_Murata-Electronics-GRM155R61A106ME44D_C77000.pdf, ComponentLink2Description="JLCPCB Part URL", ComponentLink2URL=https://jlcpcb.com/partdetail/C77000, ComponentLink3Description="LCSC Part URL", ComponentLink3URL=https://lcsc.com/product-detail/Multilayer-Ceramic-Capacitors-MLCC---SMD-SMT_Murata-Electronics-Murata-Electronics-GRM155R61A106ME44D_C77000.html, Design Item ID=GRM155R61A106ME44D, Manufacturer Part Number=GRM155R61A106ME44D, RoHS=Yes, Source=jlcpcb_capacitors_extended_0402.schlib
C33 C34_CH1 C34_CH2 C35_CH1 C35_CH2: library part CMP-001-00137-1, "Capacitor, Ceramic (MLCC), 2.2uF, ±20%, 6.3V, X5R, ±20%, SMD 0402", Case/Package=0402, JLCPCB Basic Part=Yes, JLCPCB Part Number=C12530, Manufacturer="Samsung Electro-Mechanics", Temperature Coefficient=X5R, Tolerance=20%, Voltage Rating=6.3V, Category="Capacitors - MLCC", ComponentLink1Description=Datasheet, ComponentLink1URL=https://datasheet.lcsc.com/lcsc/1811021410_Samsung-Electro-Mechanics-CL05A225MQ5NSNC_C12530.pdf, ComponentLink2Description="JLCPCB Part URL", ComponentLink2URL=https://jlcpcb.com/partdetail/C12530, ComponentLink3Description="LCSC Part URL", ComponentLink3URL=https://lcsc.com/product-detail/Multilayer-Ceramic-Capacitors-MLCC---SMD-SMT_Samsung-Electro-Mechanics-Samsung-Electro-Mechanics-CL05A225MQ5NSNC_C12530.html, Design Item ID=CL05A225MQ5NSNC, Manufacturer Part Number=CL05A225MQ5NSNC, RoHS=Yes, Source=jlcpcb_capacitors_basic.schlib
C36_CH1 C36_CH2 C37_CH1 C37_CH2: library part CMP-001-00135-1, "Capacitor, Ceramic (MLCC), 1uF, ±10%, 25V, X5R, ±10%, SMD 0402", Case/Package=0402, JLCPCB Basic Part=Yes, JLCPCB Part Number=C12530, Manufacturer="Samsung Electro-Mechanics", Temperature Coefficient=X5R, Tolerance=10%, Voltage Rating=25V, Category="Capacitors - MLCC", ComponentLink1Description=Datasheet, ComponentLink1URL=https://datasheet.lcsc.com/lcsc/1811091611_Samsung-Electro-Mechanics-CL05A105KA5NQNC_C52923.pdf, ComponentLink2Description="JLCPCB Part URL", ComponentLink2URL=https://jlcpcb.com/partdetail/C52923, ComponentLink3Description="LCSC Part URL", ComponentLink3URL=https://lcsc.com/product-detail/Multilayer-Ceramic-Capacitors-MLCC---SMD-SMT_Samsung-Electro-Mechanics-Samsung-Electro-Mechanics-CL05A105KA5NQNC_C52923.html, Design Item ID=CL05A105KA5NQNC, Manufacturer Part Number=CL05A105KA5NQNC, RoHS=Yes, Source=jlcpcb_capacitors_basic.schlib
D1 D5: library part CMP-004-00034-1, "DIODE GEN PURP 1KV 1A SOD123FL", JLCPCB Part Number=C64898, LCSC Part #=C64898
D3 D7: library part CMP-004-00035-2, "Red 0603 Light Emitting Diodes", Case/Package=Package, JLCPCB Part Number=C2286, Check_prices=https://www.snapeda.com/parts/KT-0603R/Hubei+KENTO+Elec/view-part/?ref=eda, Component Type=Standard, Design Item ID=KT-0603R, MF="Hubei KENTO Elec", MP=KT-0603R, Pins=2, SnapEDA_Link=https://www.snapeda.com/parts/KT-0603R/Hubei+KENTO+Elec/view-part/?ref=snap, Source=KT-0603R.SchLib
D4: library part CMP-004-00036-1, "40V 600mV@1A 1A SOD-323  Schottky Barrier Diodes (SBD) ROHS", JLCPCB Part Number=C191023
FB1: library part CMP-006-00022-1, "520mΩ ±25% 600Ω@100MHz 0402  Ferrite Beads ROHS", Case Code=0402, Current Rating=300mA, DC Resistance-Max=520mR, JLCPCB Part Number=C76884, Max Operating Temperature=125°C, Min Operating Temperature=-55°C, Construction="Chip Bead", Mounting Technology="Surface Mount", RoHS Compliant=Yes
J1: library part CMP-002-00088-8, "AVX edge to edge connector 10pin", JLCPCB Part Number=C5887432
J2: library part CMP-002-00099-1, "USB Connector, 16 Contact(s), Male, Right Angle, Surface Mount Terminal, Locking, Receptacle", JLCPCB Part Number=C5187472
J3: library part CMP-153-000000-4, "PTSM 0,5/ 8-2,5-H SMD R44 - PCB terminal block", Manufacturer="Phoenix Contact", Design Item ID=1771088, MP=1771088, Pin Count=8
J4: library part CMP-161-000000-3, JLCPCB Part Number=C5413697, Package=None, Availability=Unavailable, Component Type=Standard, Design Item ID=20021321-00016C4LF, MP=20021321-00016C4LF, Pin Count=16, Price=None, Source=20021321-00016C4LF.SchLib
J5 J6: library part CMP-002-00115-5, "RF SMA Connector, 1 Contact(s), Female, Board Mount, Surface Mount Terminal, Locking, Jack", Max Operating Temperature=125°C, Min Operating Temperature=-65°C, Connector Type=SMA, Mounting Technology=Board, RoHS Compliant=Yes
LS1: library part CMP-00027-00002-1, "Externally Driven Magnetic 4000Hz SMD,5x5mm  Buzzers ROHS", JLCPCB Part Number=C94598
M2: library part CMP-00004-4, "Fixed Positive LDO Regulator, 3.3V, 0.68V Dropout, CMOS, PDSO3", JLCPCB Part Number=C5446
MD1: library part CMP-00025-00006-2, "Telecom Circuit, 1-Func", Max Operating Temperature=85°C, Min Operating Temperature=-40°C, Height - Seated (Max)=2.3mm, Length=10.1mm, Pins=18, RoHS Compliant=Yes
Q1 Q2: library part CMP-013-00038-1, "N沟道 VDS=30V VGS=±12V ID=5.7A P=1.4W", JLCPCB Part Number=C20917
  Q1: LCSC Part #=C20917
Q3: library part CMP-013-00037-1, "P沟道 VDS=-30V VGS=±12V ID=-4A P=1.4W", JLCPCB Part Number=C15127
R1 R2 R4 R7 R13 R15 R22 R23 R24 R30 R38_CH1 R38_CH2: library part CMP-009-00191-1, "Resistor, 10kΩ, ±1%, 62.5mW, 50V, ±100ppm/℃, -55℃~+155℃, SMD 0402", Case/Package=0402, JLCPCB Basic Part=Yes, JLCPCB Part Number=C25744, Manufacturer=Uniroyal, Power Rating=62.5mW, Temperature Coefficient=±100ppm/℃, Temperature Rating=-55℃~+155℃, Tolerance=1%, Voltage Rating=50V, Category=Resistors, ComponentLink1Description=Datasheet, ComponentLink1URL=https://datasheet.lcsc.com/lcsc/2206010100_UNI-ROYAL-Uniroyal-Elec-0402WGF1002TCE_C25744.pdf, ComponentLink2Description="JLCPCB Part URL", ComponentLink2URL=https://jlcpcb.com/partdetail/C25744, Design Item ID=0402WGF1002TCE, Manufacturer Part Number=0402WGF1002TCE, Source=jlcpcb_resistors_basic.schlib
R3 R6: library part CMP-009-00220-1, "Resistor, 330Ω, ±1%, 62.5mW, 50V, ±100ppm/℃, -55℃~+155℃, SMD 0402", Case/Package=0402, JLCPCB Basic Part=Yes, JLCPCB Part Number=C25104, Manufacturer=Uniroyal, Power Rating=62.5mW, Temperature Coefficient=±100ppm/℃, Temperature Rating=-55℃~+155℃, Tolerance=1%, Voltage Rating=50V, Category=Resistors, ComponentLink1Description=Datasheet, ComponentLink1URL=https://datasheet.lcsc.com/lcsc/2205311900_UNI-ROYAL-Uniroyal-Elec-0402WGF3300TCE_C25104.pdf, ComponentLink2Description="JLCPCB Part URL", ComponentLink2URL=https://jlcpcb.com/partdetail/C25104, Design Item ID=0402WGF3300TCE, Manufacturer Part Number=0402WGF3300TCE, Source=jlcpcb_resistors_basic.schlib
R5 R12 R16 R17 R18 R19: library part CMP-009-00211-1, "Resistor, 2.2kΩ, ±1%, 62.5mW, 50V, ±100ppm/℃, -55℃~+155℃, SMD 0402", Case/Package=0402, JLCPCB Basic Part=Yes, JLCPCB Part Number=C25879, Manufacturer=Uniroyal, Power Rating=62.5mW, Temperature Coefficient=±100ppm/℃, Temperature Rating=-55℃~+155℃, Tolerance=1%, Voltage Rating=50V, Category=Resistors, ComponentLink1Description=Datasheet, ComponentLink1URL=https://datasheet.lcsc.com/lcsc/2206010045_UNI-ROYAL-Uniroyal-Elec-0402WGF2201TCE_C25879.pdf, ComponentLink2Description="JLCPCB Part URL", ComponentLink2URL=https://jlcpcb.com/partdetail/C25879, Design Item ID=0402WGF2201TCE, Manufacturer Part Number=0402WGF2201TCE, Source=jlcpcb_resistors_basic.schlib
R8 R9: library part CMP-009-00235-1, "Resistor, 5.1kΩ, ±1%, 62.5mW, 50V, ±100ppm/℃, -55℃~+155℃, SMD 0402", Case/Package=0402, JLCPCB Basic Part=Yes, JLCPCB Part Number=C25905, Manufacturer=Uniroyal, Power Rating=62.5mW, Temperature Coefficient=±100ppm/℃, Temperature Rating=-55℃~+155℃, Tolerance=1%, Voltage Rating=50V, Category=Resistors, ComponentLink1Description=Datasheet, ComponentLink1URL=https://datasheet.lcsc.com/lcsc/2206010045_UNI-ROYAL-Uniroyal-Elec-0402WGF5101TCE_C25905.pdf, ComponentLink2Description="JLCPCB Part URL", ComponentLink2URL=https://jlcpcb.com/partdetail/C25905, Design Item ID=0402WGF5101TCE, Manufacturer Part Number=0402WGF5101TCE, Source=jlcpcb_resistors_basic.schlib
R10: library part CMP-009-00190-1, "Resistor, 1kΩ, ±1%, 62.5mW, 50V, ±100ppm/℃, -55℃~+155℃, SMD 0402", Case/Package=0402, JLCPCB Basic Part=Yes, JLCPCB Part Number=C11702, Manufacturer=Uniroyal, Power Rating=62.5mW, Temperature Coefficient=±100ppm/℃, Temperature Rating=-55℃~+155℃, Tolerance=1%, Voltage Rating=50V, Category=Resistors, ComponentLink1Description=Datasheet, ComponentLink1URL=https://datasheet.lcsc.com/lcsc/2206010216_UNI-ROYAL-Uniroyal-Elec-0402WGF1001TCE_C11702.pdf, ComponentLink2Description="JLCPCB Part URL", ComponentLink2URL=https://jlcpcb.com/partdetail/C11702, Design Item ID=0402WGF1001TCE, Manufacturer Part Number=0402WGF1001TCE, Source=jlcpcb_resistors_basic.schlib
R14: library part CMP-009-00210-1, "Resistor, 220Ω, ±1%, 62.5mW, 50V, ±100ppm/℃, -55℃~+155℃, SMD 0402", Case/Package=0402, JLCPCB Basic Part=Yes, JLCPCB Part Number=C25091, Manufacturer=Uniroyal, Power Rating=62.5mW, Temperature Coefficient=±100ppm/℃, Temperature Rating=-55℃~+155℃, Tolerance=1%, Voltage Rating=50V, Category=Resistors, ComponentLink1Description=Datasheet, ComponentLink1URL=https://datasheet.lcsc.com/lcsc/2205311900_UNI-ROYAL-Uniroyal-Elec-0402WGF2200TCE_C25091.pdf, ComponentLink2Description="JLCPCB Part URL", ComponentLink2URL=https://jlcpcb.com/partdetail/C25091, Design Item ID=0402WGF2200TCE, Manufacturer Part Number=0402WGF2200TCE, Source=jlcpcb_resistors_basic.schlib
R25 R34_CH1 R34_CH2 R35_CH1 R35_CH2 R36_CH1 R36_CH2: library part CMP-009-00229-1, "Resistor, 47kΩ, ±1%, 62.5mW, 50V, ±100ppm/℃, -55℃~+155℃, SMD 0402", Case/Package=0402, JLCPCB Basic Part=Yes, JLCPCB Part Number=C25792, Manufacturer=Uniroyal, Power Rating=62.5mW, Temperature Coefficient=±100ppm/℃, Temperature Rating=-55℃~+155℃, Tolerance=1%, Voltage Rating=50V, Category=Resistors, ComponentLink1Description=Datasheet, ComponentLink1URL=https://datasheet.lcsc.com/lcsc/2206010100_UNI-ROYAL-Uniroyal-Elec-0402WGF4702TCE_C25792.pdf, ComponentLink2Description="JLCPCB Part URL", ComponentLink2URL=https://jlcpcb.com/partdetail/C25792, Design Item ID=0402WGF4702TCE, Manufacturer Part Number=0402WGF4702TCE, Source=jlcpcb_resistors_basic.schlib
R26: library part CMP-009-00241-1, "Resistor, 680Ω, ±1%, 62.5mW, 50V, ±100ppm/℃, -55℃~+155℃, SMD 0402", Case/Package=0402, JLCPCB Basic Part=Yes, JLCPCB Part Number=C25130, Manufacturer=Uniroyal, Power Rating=62.5mW, Temperature Coefficient=±100ppm/℃, Temperature Rating=-55℃~+155℃, Tolerance=1%, Voltage Rating=50V, Category=Resistors, ComponentLink1Description=Datasheet, ComponentLink1URL=https://datasheet.lcsc.com/lcsc/2205311900_UNI-ROYAL-Uniroyal-Elec-0402WGF6800TCE_C25130.pdf, ComponentLink2Description="JLCPCB Part URL", ComponentLink2URL=https://jlcpcb.com/partdetail/C25130, Design Item ID=0402WGF6800TCE, Manufacturer Part Number=0402WGF6800TCE, Source=jlcpcb_resistors_basic.schlib
R37_CH1 R37_CH2: library part CMP-009-00212-1, "Resistor, 22kΩ, ±1%, 62.5mW, 50V, ±100ppm/℃, -55℃~+155℃, SMD 0402", Case/Package=0402, JLCPCB Basic Part=Yes, JLCPCB Part Number=C25768, Manufacturer=Uniroyal, Power Rating=62.5mW, Temperature Coefficient=±100ppm/℃, Temperature Rating=-55℃~+155℃, Tolerance=1%, Voltage Rating=50V, Category=Resistors, ComponentLink1Description=Datasheet, ComponentLink1URL=https://datasheet.lcsc.com/lcsc/2206010100_UNI-ROYAL-Uniroyal-Elec-0402WGF2202TCE_C25768.pdf, ComponentLink2Description="JLCPCB Part URL", ComponentLink2URL=https://jlcpcb.com/partdetail/C25768, Design Item ID=0402WGF2202TCE, Manufacturer Part Number=0402WGF2202TCE, Source=jlcpcb_resistors_basic.schlib
RT1 RT2: library part CMP-038-000000-2, "PTC Resettable Fuse: 2A Hold, 4A Trip, 0603", Hold Current=2A, JLCPCB Part Number=C2757930, Package=0603, Trip Current=4A, Availability=Unavailable, Component Type=Standard, Design Item ID=BSMD0603L-200, MP=BSMD0603L-200, Pin Count=2
SW1 SW2: library part CMP-011-00021-3, "Switch Tactile N.O. SPST Rectangular Button Gull Wing 0.05A 12VDC 2.2N SMD Embossed T/R", JLCPCB Part Number=C79167
U1 U2 U3: library part CMP-007-00038-2, "1615 RGB LEDs(Built-in IC) ROHS", JLCPCB Part Number=C5349954
U4: library part CMP-00025-00003-3, "LoRa-CC68 targeting 868MHz and with a TXCO"
U5: library part CMP-040-000000-2, "FLASH - NOR Memory IC 128Mb (16M x 8) SPI - Quad I/O, QPI, DTR 133 MHz 8-SOIC", Capacity=128Mb, JLCPCB Part Number=C97521, Package="SOIC-8 Winbond", Design Item ID=W25Q128JVSIQ, LCSC Part #=C97521, MF="Winbond Electronics", MP=W25Q128JVSIQ, Pin Count=8, Price=None
U6: library part CMP-157-000000-2, "No Description Available", JLCPCB Part Number=C5368700, Mfr_Name="Bosch Sensortec", Design Item ID=BMI323, RefDes=RefDes, Source=BMI323.SchLib, Type=Type
U7: library part CMP-010-00039-1, "H3LIS331DL Series 3.6 V ±100/±200/±400 g 3-Axis Digital Accelerometer - TFLGA-16", Case/Package=LGA, Max Operating Temperature=85°C, Max Supply Voltage=3.6V, Min Operating Temperature=-40°C, Min Supply Voltage=2.16V, Nominal Supply Voltage (DC)=2.5V, Temperature Grade=Industrial, Axis="X, Y, Z", Bandwidth=500Hz, China RoHS=Non-Compliant, Depth=3mm, Height=1mm, Height - Seated (Max)=1mm, Interface="I2C, SPI", Lead Free="Lead Free", Length=3mm, Lifecycle Status=Production, Mounting Technology="Surface Mount", Number of Circuits=1, Number of Terminals=16, Operating Supply Voltage=2.5V, Output Type=Digital, Packaging="Cut Tape", Pins=16, Radiation Hardening=No, REACH SVHC=Unaffected, Resolution=2B, RoHS=Compliant, Schedule B="8542390000, 8542390000", Sensor Type="3 Axis", Terminal Pitch=500µm, Width=3mm
U8: library part CMP-010-00038-1, "Board Mount Hall Effect / Magnetic Sensors 3-Axis 1.56x1.56mm WLCSP-12 Geomagnetic", Ambient Temperature Range High=85°C, Case/Package=SMD/SMT, Max Supply Voltage=3.6V, Min Operating Temperature=-40°C, Min Supply Voltage=1.2V, Height=595µm, Max Operating Temperature=85°C, Operating Supply Voltage=3.6V, Output Type="I2C, SPI", RoHS=Compliant, Sensing Method="Hall Effect"
U9: library part CMP-010-00034-3, "Absolute, 4.35Psi Min, 15.95Psi Max, 0-3V, Rectangular, Surface Mount", JLCPCB Part Number=C97627, Max Operating Temperature=85°C, Max Supply Voltage=3.6V, Min Operating Temperature=-40°C, Min Supply Voltage=1.8V, Mounting Technology="Surface Mount", RoHS Compliant=Yes, Sensor Type="PRESSURE SENSOR,PEIZORESISTIVE"
U10: library part CMP-019-00060-6, "2.7-V to 16-V, 10-A, 6-mΩ load switch with fast overvoltage protection and current monitoring 10-VQFN-HR -40 to 125", JLCPCB Part Number=C17294173
U11_CH1 U11_CH2: library part CMP-019-00059-2, "Buffer/Inverter Based Peripheral Driver, 1 Driver, PDSO6", Case/Package=VSON, JLCPCB Part Number=C527679, Max Operating Temperature=105°C, Max Supply Voltage=18V, Min Operating Temperature=-40°C, Min Supply Voltage=2.7V, Height - Seated (Max)=0.8mm, JESD-30 Code=S-PDSO-N6, Pins=6, RoHS Compliant=Yes
Y1: library part CMP-003-00030-1, "Crystal 16MHz ±20ppm (Tol) ±30ppm (Stability) 8pF FUND 80Ohm Automotive 4-Pin SMD", JLCPCB Part Number=C156247
Y2: library part CMP-003-00031-1, "Crystal 32.7680KHZ 7PF SMD", JLCPCB Part Number=C70509

## Free pads (board coordinates)
  round 125.98 hole 125.98 unplated mask+51.18: 4(1037.97,2440.94)

## Via types
v1: diameter 11.81, hole 7.87, Top to Bottom, tented both sides, 324 vias

## Nets (pads, with @x,y where several pads share a name; then routed paths per layer and width w, separated by ;. In a path a pad name is that pad's centre, name@x,y a point inside that pad or via, vN(x,y) a via of type N, cw(c..) or ccw(c..) an arc to the next point about the centre after c; other vN are vias at no path point)
3V3: B1.19 B1.32 B1.48 B1.64 B2.2 B2.4 C9.2 C10.2 C11.2 C12.2 C13.2 C14.2 C15.2 C16.2 C17.2 C18.2 C19.2 C21.2 C22.2 C23.2 C24.2 C25.1 C27.2 C28.2 C29.1 D1.2 FB1.2 J1.10 J3.3 J4.7 J4.10 LS1.1 MD1.7 MD1.8 R1.2 R5.2 R10.1 R12.2 R14.2 R15.2 R16.2 R17.2 R18.2 R19.2 R24.2 SW1.1 SW1.1' U1.2 U2.2 U3.2 U4.13 U5.8 U6.5 U6.8 U7.1 U7.14 U8.A1 U8.B2 U8.E5 U9.1 U9.2 | length 3220.4
  Top w5: B1.64@758.15,1845 759.07,1845.93 759.07,1899.07 v1(760,1900) ; v1(793.71,1434.62) 793.71,1432.78 797.52,1428.96 B1.19@797.52,1393.19 ; v1(960,1222.32) 993.54,1255.86 1009.33,1255.86 1010.2,1255 ; J4.7@1015,940.24 1015,922.46 v1(1027.46,910) ; C14.2@1054.21,1338.11 v1(1054.21,1340.67) 1053.43,1341.46 1053.43,1391.61 B1.32@1054.21,1392.4 ; v1(1363.82,1358.31) 1414.02,1358.31 v1(1415,1357.32)
  Top w10: R14.2@482.72,2080 485.55,2082.83 v1(490,2082.83) ; B1.32@1053.43,1393.19 B1.32@1054.21,1392.4 ; C14.2@1054.21,1338.11 C14.2@1055,1337.32 ; v1(1117.68,1845) v1(1117.68,1810) 1117.68,1767.64 1118.58,1766.73 B1.48@1131.69,1766.73 ; v1(1150,2197.32) 1081.81,2197.32 v1(1081.1,2196.61) v1(1081.1,2239.92) 1091.02,2230 v1(1152.68,2230) 1153.46,2230 1160.67,2237.2 1160.67,2246.75 1169,2255.08 ; 1169.03,2255.08 1180.91,2266.95 1180.91,2273.35 1186.73,2279.17 R10.1@1187.72,2279.17 ; U9.2@1314.61,1358.31 v1(1363.82,1358.31)
  Power w10: v1(505.98,2516.73) v1(505.98,2436.73) 505.94,2436.69 505.94,2354.37 v1(505.91,2354.33) 736.3,2354.33 780.63,2310 1011.02,2310 v1(1081.1,2239.92) 1091.02,2230 v1(1152.68,2230) 1162.68,2220 1300.91,2220 v1(1420,2339.09)
  Bottom w3.94: C24.2@1070.16,1177.17 v1(1080,1167.32)
  Bottom w5: v1(425,1790) 426.3,1790 451.3,1815 R1.2@452.28,1815 ; D1.2@540.5,1390 540.5,1337.85 569.45,1308.9 LS1.1@585.2,1308.9 ; FB1.2@697.66,1490.31 708.34,1479.63 714.9,1479.63 721,1473.53 721,1451.1 737.1,1435 v1(738.94,1435) ; v1(793.71,1434.62) 793.71,1403.61 C12.2@800,1397.32 C9.2@835,1397.32 ; v1(942.72,695) R24.2@946.65,695 ; U5.8@1046.93,1480 1049.04,1480 1057.93,1471.11 1057.93,1445.93 1067.64,1436.22 C21.2@1068.43,1436.22 ; v1(1275,1214.13) 1275,1215.98 1277.28,1218.26 R12.2@1277.28,1245
  Bottom w10: SW1.1@505.91,2212.6 505.91,2283.11 505.19,2283.82 505.19,2353.61 v1(505.91,2354.33) ; v1(739.74,1350.03) 740.09,1350.37 744.07,1350.37 765,1371.3 R15.2@765,1372.28 ; v1(915,883.98) R19.2@915,925 R19.2@915,933.57 ; R19.2@918.28,923.49 920.83,920.94 1006.7,920.94 B2.2@1007.64,920 ; v1(1210,910) 1240,880 v1(1245,880) ; B2.4@1212.36,920 1224.69,932.32 C19.2@1300,932.32 ; v1(1290,1965) 1296.89,1965 v1(1334.33,1927.56) 1335.12,1927.56 C17.2@1337.68,1925 ; v1(1335,1150) 1335.16,1150.16 U7.14@1335.16,1168.07 ; U7.14@1335,1170 1335,1182.18 1342.78,1189.96 1386.91,1189.96 1405,1171.87 U7.1@1405,1160 ; v1(1398.21,1041.26) 1401.16,1038.31 1447.05,1038.31 C27.2@1450,1035.35 ; v1(1402.72,1285) 1403.7,1285 1448.39,1240.32 C28.2@1462.8,1240.32 ; U6.8@1408.53,1469.5 1408.53,1465 1416.2,1457.32 v1(1460,1457.32) ; U6.5@1415,1534.68 1419.5,1534.68 1437.14,1552.32 v1(1460,1552.32) ; J1.10@1417.32,2303.15 1420,2305.83 v1(1420,2339.09)
  other v1: 810,790 805,810 800,835 1245,910 1210,940 1245,940 1210,970 1245,970 965,1080 920,1180 845,1247.28 900,1250 585,1325 525,1365 1030,1475 715,1852.68
BAT+: J3.2 RT1.1
  other v1: 690,895 710,895 690,910 710,910
BOOT0: B1.60 R2.2 R7.2 SW1.2 SW1.2' | length 871.8
  Top w5: v1(835,1915) 835,1913.16 836.89,1911.27 B1.60@836.89,1845
  Bottom w5: SW1.2@448.82,2212.6 448.82,2205.71 SW1.2@455.32,2199.21 ; R2.2@472.72,2160 471.73,2160 463.41,2168.33 463.41,2191.12 SW1.2@455.32,2199.21 ; v1(835,1915) 835,2004.53 682.43,2157.11 497.42,2157.11 SW1.2@455.32,2199.21
  Bottom w10: R7.2@447.28,2400 447.28,2355.87 SW1.2'@448.82,2354.33 SW1.2@448.82,2212.6
BUZZ: B1.9 R3.1 | length 572.2
  Top w5: B1.9@679.88,1609.25 v1(716.86,1609.25)
  Inner w5: v1(716.86,1609.25) 716.86,1346.88 799.68,1264.06 v1(799.68,1144.68)
  Bottom w5: v1(799.68,1144.68) 801.53,1144.68 803.92,1142.28 R3.1@835,1142.28
CONT_CH1: B1.20 R35_CH1.1 R37_CH1.2 | length 1639.1
  Top w5: v1(815.52,1434.48) 816.36,1433.64 816.36,1404.92 B1.20@820.61,1400.67
  Inner w5: v1(572.28,440) 553.88,458.41 553.88,603.88 570,620 570,1298.07 566.79,1301.27 566.79,1317.18 566.59,1317.38 566.59,1557.62 638.97,1630 705,1630 707.34,1627.66 724.49,1627.66 735.27,1616.88 735.27,1539.73 815,1460 815,1435 v1(815.52,1434.48)
  Bottom w20: R37_CH1.2@571.3,440 v1(572.28,440) R35_CH1.1@572.28,489.17
CONT_CH2: B1.26 R35_CH2.1 R37_CH2.2 | length 1069.3